# Altium PCB LLR-05U (Main-Board-PCB).PcbDoc
Units mil, origin at the board's own origin, x right, y up, seen from the top; angles counter-clockwise.
Board outline 1291.34 x 3385.83 mil, 2 copper layers (Top Layer, Bottom Layer), stack 57 mil thick; 28 components, 31 nets, 83 pads, 7 vias.
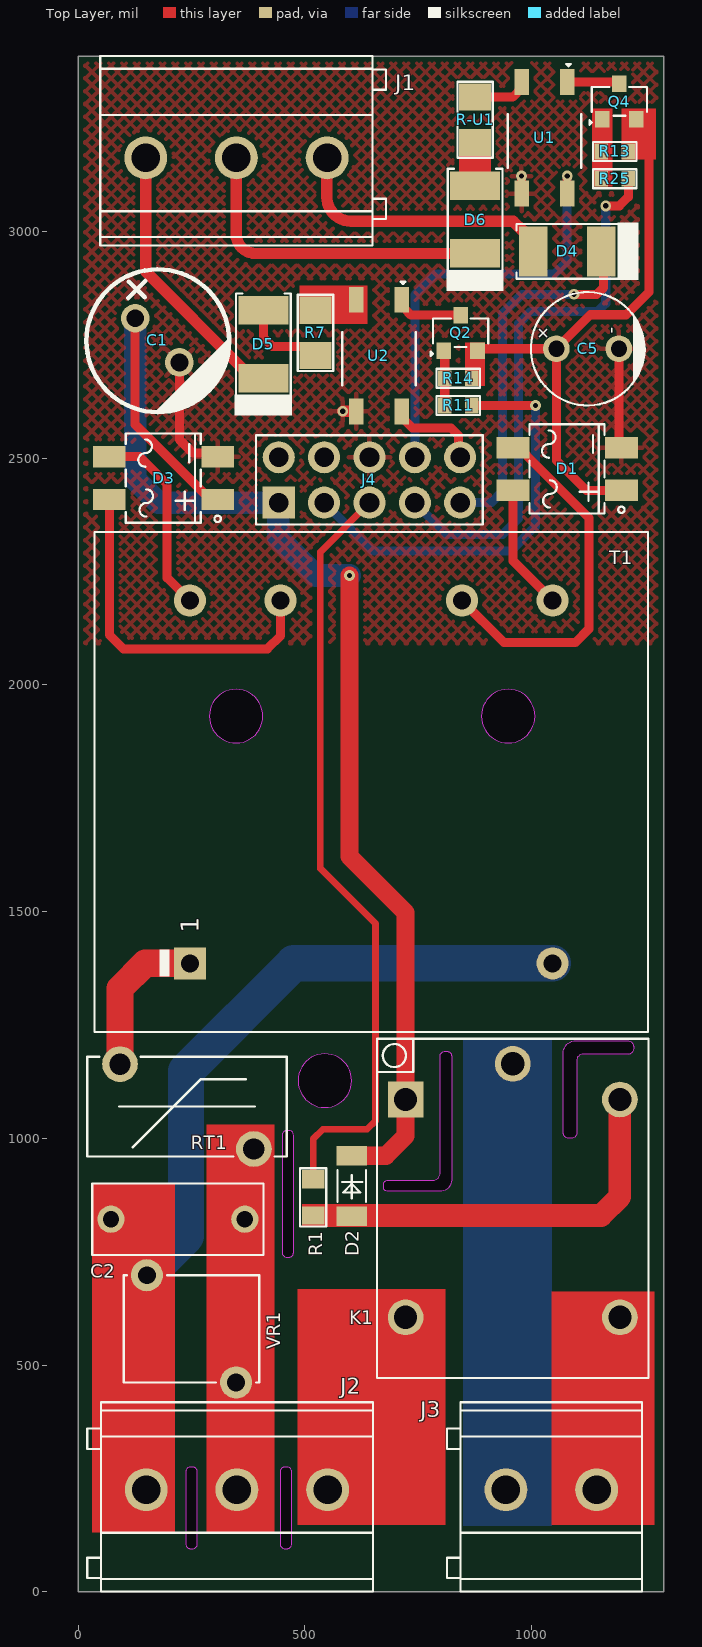
[diagram p0: Top Layer view]
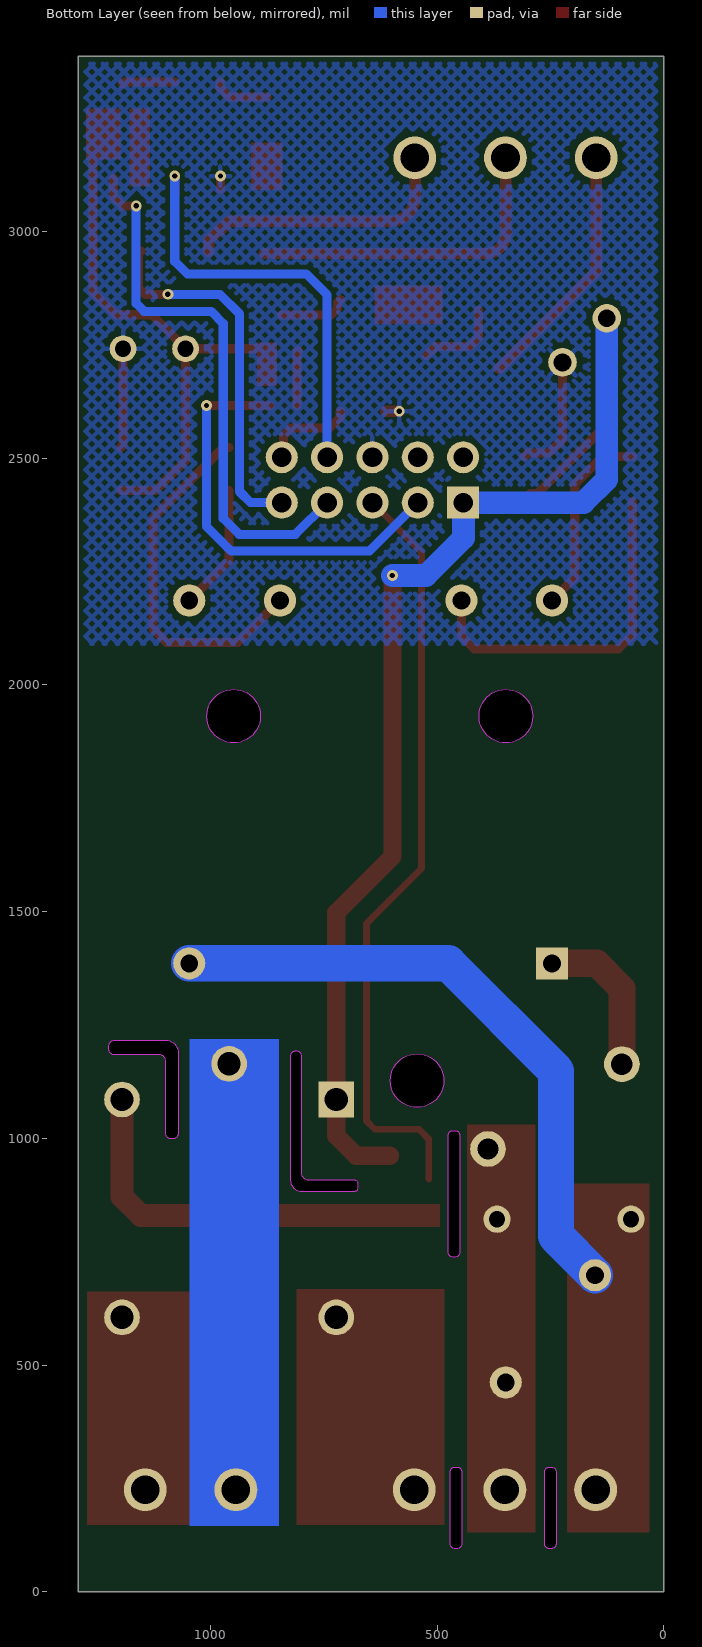
[diagram p1: Bottom Layer view, seen from below]
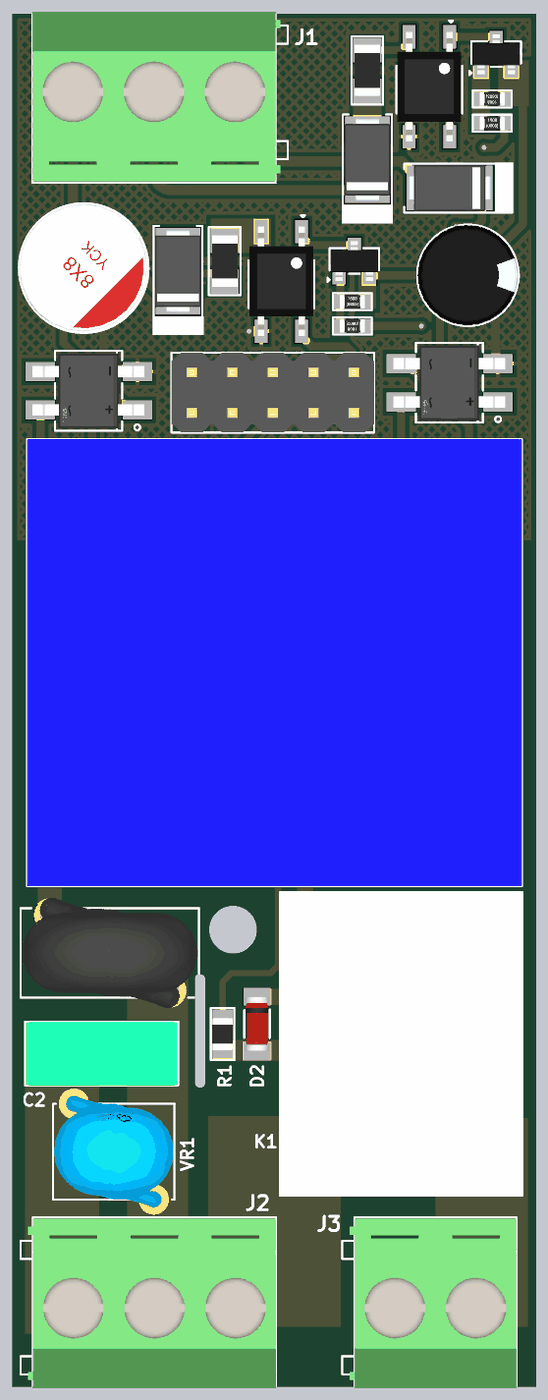
[diagram p2: 3D render of the assembled board from above, using the file's embedded part models]

## Layer stack, top to bottom
Top Solder: solder mask 3, Solder Resist, Dk 3.5
Top Layer: signal copper 10
Dielectric 1: dielectric 37, FR-4, Dk 4.8
Bottom Layer: signal copper 10
Bottom Solder: solder mask 3, Solder Resist, Dk 3.5

## Board outline
0,0 0,3385.83 1291.34,3385.83 1291.34,0
cut-out: 450,748 ccw(c460,748) 460,738 465,738 ccw(c465,748) 475,748 475,1007 ccw(c465,1007) 465,1017 460,1017 ccw(c460,1007) 450,1007
cut-out: 237.65,105.24 ccw(c247.65,105.24) 247.65,95.24 252.65,95.24 ccw(c252.65,105.24) 262.65,105.24 262.65,265.24 ccw(c252.65,265.24) 252.65,275.24 247.65,275.24 ccw(c247.65,265.24) 237.65,265.24
cut-out: 673.34,892.83 673.34,897.83 cw(c683.34,897.83) 683.34,907.83 783.34,907.83 ccw(c783.34,922.83) 798.34,922.83 798.34,1181.83 cw(c808.34,1181.83) 808.34,1191.83 813.34,1191.83 cw(c813.34,1181.83) 823.34,1181.83 823.34,907.83 cw(c798.34,907.83) 798.34,882.83 683.34,882.83 cw(c683.34,892.83)
cut-out: 289.28,1930.83 ccw(c348.34,1930.83) 348.34,1871.77 ccw(c348.34,1930.83) 407.39,1930.83 ccw(c348.34,1930.83) 348.34,1989.88 ccw(c348.34,1930.83)
cut-out: 889.28,1930.83 ccw(c948.34,1930.83) 948.34,1871.77 ccw(c948.34,1930.83) 1007.39,1930.83 ccw(c948.34,1930.83) 948.34,1989.88 ccw(c948.34,1930.83)
cut-out: 484.91,1127.14 ccw(c543.97,1127.14) 543.97,1068.09 ccw(c543.97,1127.14) 603.02,1127.14 ccw(c543.97,1127.14) 543.97,1186.2 ccw(c543.97,1127.14)
cut-out: 445.65,105.24 ccw(c455.65,105.24) 455.65,95.24 460.65,95.24 ccw(c460.65,105.24) 470.65,105.24 470.65,265.24 ccw(c460.65,265.24) 460.65,275.24 455.65,275.24 ccw(c455.65,265.24) 445.65,265.24
cut-out: 1224.63,1202.61 1224.63,1197.61 cw(c1212.12,1197.61) 1212.12,1185.1 1112.12,1185.1 ccw(c1112.12,1172.61) 1099.63,1172.61 1099.63,1012.61 cw(c1087.12,1012.61) 1087.12,1000.1 1082.12,1000.1 cw(c1082.12,1012.61) 1069.6,1012.61 1069.6,1187.61 cw(c1097.12,1187.61) 1097.12,1215.13 1212.12,1215.13 cw(c1212.12,1202.61)

## Design rules (kind name [scope] priority, off if disabled: settings)
BoardOutlineClearance [All] p1: gap=0 ignorepadtopadclearanceinfootprint=FALSE except(10: Poly-OutlineEdge)
Clearance [All] p1: gap=10 ignorepadtopadclearanceinfootprint=FALSE except(0: Arc-Hole Track-Hole SMDPad-Hole THPad-Hole Via-Hole Fill-Hole Poly-Hole Region-Hole Text-Hole)
ComponentClearance [All] p1: gap=0 collisioncheckmode=3 verticalgap=0 showdistances=FALSE
Height [All] p1: minheight=0 maxheight=5000 prefheight=500
PolygonConnect [All] p1: connectstyle=Relief reliefconductorwidth=10 reliefentries=4 polygonreliefangle="90 Angle" airgapwidth=10
RoutingVias [All] p1: holewidth=11.81 width=23.62 viastyle="Through Hole" minholewidth=11.81 minwidth=23.62 maxholewidth=11.81 maxwidth=23.62
SilkToSolderMaskClearance [IsPad] p1: minsilkscreentomaskgap=0 clearancetoexposedcopper=TRUE
SolderMaskExpansion [All] p1: expansion=4 istentingtop=FALSE
Width [All] p1: maxlimit=100 minlimit=7 preferedwidth=10 minimp=50.000000 maximp=50.000000 favimp=50.000000
27 further rules are at their usual default settings.

## Components (designator, comment, footprint, x,y, rotation, side; value= is the part's Value field where it differs from the comment)
C1 "330uF" RC035M331LO8*14TH-2A1E 174.62,2759.55 r315 top
C2 "100nF- 400V" 82CL0114 220,821.74 r0 top
C5 "47uF" Plugin,D6.3xL12mm 1123.34,2740.83 r0 top
D1 "MB10S" MBS10S 1078.34,2475.83 r180 top
D2 "LL4148" LL-34 603.34,894.83 r270 top
D3 "MB10S" MBS10S 188.34,2455.83 r180 top
D4 "M7" SMA(DO-214AC) 1078.34,2955.83 r180 top
D5 "M7" SMA(DO-214AC) 408.34,2750.83 r90 top
D6 "M7" SMA(DO-214AC) 875.34,3025.83 r90 top
J1 "KF129-5.08-3P" KF129-5.08-3P 349.04,3161.71 r180 top
J2 "KF129-5.08-3P" KF129-5.08-3P 350.22,225.24 r0 top
J3 "KF129-5.08-2P" KF129-5.08-2P 1043.34,225.3 r0 top
J4 "PH-01338" PH-01338 642.39,2451.57 r0 top
K1 "HF3FA-012-ZSTF" HF3FA-012-ZSTF 958.34,884.83 r270 top
Q2 "BC856B" SOT-23 843.34,2775.83 r0 top
Q4 "BC856B" SOT-23 1193.34,3285.83 r0 top
R1 "10R" RES-0805 518.34,869.83 r270 top
R7 "2.2K" Res-1206 523.34,2775.83 r90 top
R11 "1K" Res-0603 838.34,2615.83 r0 top
R13 "47K" Res-0603 1183.34,3175.83 r0 top
R14 "47K" Res-0603 838.34,2675.83 r180 top
R25 "1K" Res-0603 1183.34,3115.83 r180 top
R-U1 "2.2K" Res-1206 875.34,3245.83 r90 top
RT1 "10R" 10D-9 240,1070 r180 top
T1 "PE2818-I 2VA 220V 12Vx2" PE2818-I 646.34,1785.83 r90 top
U1 "TLP185(GB-TPL,SE(T" SOP-4_2.54 1028.34,3205.83 r270 top
U2 "TLP185(GB-TPL,SE(T" SOP-4_2.54 663.34,2725.83 r270 top
VR1 "VDR-05D471K" VDR-05D471K 250,580 r0 top

## Footprints (in the part's own frame and the unit in brackets; to place one, negate y for a bottom-side part, rotate by r counter-clockwise, add the part's x,y. Pads: shape width x height; smd on the part's side, far side on the other; paste and mask are expansions set on the pad)
10D-9 [mm]
  round 2 hole 1.2 paste+0 mask+0.051: 1(-3.75,2.375) 2(3.75,-2.375)
  silkscreen extent -5.59,-2.79 5.59,2.79, body extent -5.5,-3.46 5.5,3.46, height 15.1
82CL0114 [mil]
  round 60 hole 36 paste+0 mask+2: 1(-147.64,0) 2(147.64,0)
  silkscreen extent -189,-79 189,79, body extent -187,-79 187,79, height 354
HF3FA-012-ZSTF [mm]
  rect 2x2 hole 1.3 paste+0 mask+0.051: 1(-5.1,-6)
  round 2 hole 1.3 paste+0 mask+0.051: 2(7.1,-6) 3(7.1,6) 4(-5.1,6) 5(-7.1,0)
  silkscreen extent -8.5,-7.6 10.5,7.6, body extent -8.5,-7.6 10.5,7.61, height 15.5
KF129-5.08-2P [mm]
  round 2.4 hole 1.6 paste+0 mask+0.051: 1(-2.54,0) 2(2.54,0)
  silkscreen extent -5.84,-5.7 5.08,4.9, body extent -5.38,-5.8 5.08,4.8, height 18.4
KF129-5.08-3P [mm]
  round 2.4 hole 1.6 paste+0 mask+0.051: 1(-5.08,0) 2(0,0) 3(5.08,0)
  silkscreen extent -8.38,-5.7 7.62,4.9, body extent -7.92,-5.8 7.62,4.8, height 18.4
LL-34 [mm]
  rect 1.1x1.7 smd paste+0 mask+0.051: 1(-1.7,0) 2(1.7,0)
  silkscreen extent -0.9,-0.8 0.9,0.8, body extent -1.7,-0.74 1.7,0.74, height 1.5
MBS10S [mm]
  rect 1.84x1.2 smd paste+0 mask+0.051: 1(-3.037,1.2) 2(-3.036,-1.2) 3(3.037,-1.2) 4(3.036,1.2)
  silkscreen extent -3.21,-2.5 2.11,2.5, body extent -3.47,-2.35 3.53,2.35, height 2.62
PE2818-I [mm]
  rect 1.8x1.8 hole 1: 1(-10.16,10.16)
  round 1.8 hole 1: 5(-10.16,-10.16) 6(10.16,-10.16) 7(10.16,-5.08) 9(10.16,5.08) 10(10.16,10.16)
  silkscreen extent -14,-15.5 14,15.5, body extent -14,-15.5 14,15.5, height 31.5
PH-01338 [mm]
  rect 1.8x1.8 hole 1.1 paste+0 mask+0.051: 1(-5.08,-1.27)
  round 1.8 hole 1.1 paste+0 mask+0.051: 2(-5.08,1.27) 3(-2.54,-1.27) 4(-2.54,1.27) 5(0,-1.27) 6(0,1.27) 7(2.54,-1.27) 8(2.54,1.27) 9(5.08,-1.27) 10(5.08,1.27)
  silkscreen extent -6.35,-2.5 6.35,2.5, body extent -6.35,-2.5 6.36,2.5, height 15
Plugin,D6.3xL12mm [mm]
  round 1.5 hole 0.9 paste+0 mask+0.05: 1(-1.75,0) 2(1.75,0)
  silkscreen extent -3.17,-3.17 3.26,3.17, body extent -3.15,-3.15 3.15,3.15, height 12.1
RC035M331LO8*14TH-2A1E [mm]
  round 1.6 hole 1 paste+0 mask+0.051: 1(-1.75,0) 2(1.75,0)
  silkscreen extent -3.96,-4 4.04,4, body extent -4,-4.01 4,4, height 8
Res-0603 [mil]
  rect 30x35 smd: 1(-30,0) 2(30,0)
  silkscreen extent -48,-21 48,21, body extent -31,-17 31,17, height 18
RES-0805 [mil] "SMD 0805"
  rect 40x50 smd: 1(-40,0) 2(40,0)
  silkscreen extent -64,-29 64,29, body extent -39,-25 39,24, height 24
Res-1206 [mil]
  rect 60x70 smd: 1(-50,0) 2(50,0)
  silkscreen extent -84,-39 84,39, body extent -63,-31 63,31, height 24
SMA(DO-214AC) [mm]
  rect 1.6x2.8 smd: 1(-1.9,0) 2(1.9,0)
  silkscreen extent -3.99,-1.6 2.84,1.6, body extent -2.6,-1.45 2.6,1.45, height 2.3
SOP-4_2.54 [mm]
  rect 1.45x0.8 smd: 1(-3.125,1.27) 2(-3.125,-1.27) 3(3.125,-1.27) 4(3.125,1.27)
  silkscreen extent -4.14,-2.06 1.68,2.06, body extent -3.43,-2 3.43,2, height 2.02
SOT-23 [mm] "TRANS NPN 40V 0.6A SOT23"
  rect 0.82x0.92 smd: 1(-0.95,-1) 2(0.95,-1) 3(0,1)
  silkscreen extent -1.68,-1.3 1.55,0.81, body extent -1.5,-1.25 1.5,1.25, height 1.05
VDR-05D471K [mm]
  round 1.8 hole 1 paste+0 mask+0.051: 1(-2.5,3) 2(2.5,-3)
  silkscreen extent -3.8,-3 3.81,3, body extent -3.74,-3.5 3.74,3.5, height 9.09

## Part data
C1: library part RC035M331LO8*14TH-2A1E, "330uF 35V ±20% 860mA@100kHz Plugin,D8xL14mm Aluminum Electrolytic Capacitors - Leaded ROHS", LCSC Part Number=C357626, Manufacturer="BERYL Electronic Tech", Package=Plugin,D8xL14mm, ComponentLink1Description=LCSC, ComponentLink1URL=https://www.lcsc.com/product-detail/Aluminum-Electrolytic-Capacitors-Leaded_BERYL-Electronic-Tech-RC035M331LO8-14TH-2A1E_C357626.html, Item Type=Capacitor, Manufacturer Part Number=RC035M331LO8*14TH-2A1E
C2: library part 82CL0114, "5% 400V 100nF PET Plugin,P=7.5mm Film Capacitors ROHS", LCSC Part Number=C5359295, Manufacturer=KNSCHA, Package=Plugin,P=7.5mm, ComponentLink1Description=LCSC, ComponentLink1URL=https://www.lcsc.com/product-detail/Film-Capacitors_KNSCHA-82CL0114_C5359295.html, Manufacturer Part Number=82CL0114
C5: library part 03EC0571, "47uF 50V ±20% 180mA@100kHz Plugin,D6.3xL12mm Aluminum Electrolytic Capacitors - Leaded ROHS", LCSC Part Number=C2831773, Manufacturer=KNSCHA, Package=Plugin,D6.3xL12mm, ComponentLink1Description=LCSC, ComponentLink1URL=https://www.lcsc.com/product-detail/Aluminum-Electrolytic-Capacitors-Leaded_KNSCHA-03EC0571_C2831773.html, Item Type=Capacitor, Manufacturer Part Number=03EC0571
D1 D3: "35A 1.1V@400mA 1A 1kV MBS Bridge Rectifiers ROHS", JLCPCB Part Number=C2488, Manufacturer=MDD, Package=MBS, ComponentLink1Description=LCSC, ComponentLink1URL=https://www.lcsc.com/product-detail/Bridge-Rectifiers_MCC_MB6S-TP_MB6S-TP_C85619.html?gclid=CjwKCAjwjOunBhB4EiwA94JWsPhP5VxdRhkKtNAXxaeRo8Kbw1z5VNRY74bvbkYd4a4LtLXYHGrsEhoCPX4QAvD_BwE, Item Type="Bridge Rectifier", Manufacturer Part Number=MB10S
D2: "75V 1V@10mA 4ns 200mA LL-34 Switching Diode ROHS", LCSC Part Number=C435829, Manufacturer=MDD, Package=LL-34, ComponentLink1Description=LCSC, ComponentLink1URL=https://www.lcsc.com/product-detail/Switching-Diode_MDD-Microdiode-Electronics-LL4148_C435829.html, Item Type=Diode, Manufacturer Part Number=LL4148
D4 D5 D6: "1A 1.1V@1A 1kV DO-214AC Diodes - General Purpose ROHS", LCSC Part Number=C2902910, Manufacturer=MSKSEMI, Package=DO-214AC, ComponentLink1Description=LCSC, ComponentLink1URL=https://www.lcsc.com/product-detail/Diodes-General-Purpose_MSKSEMI-M7_C2902910.html, Item Type=Diode, Manufacturer Part Number=M7
J1 J2: "1x3P 24A -40℃~+105℃ 250V Green 12~24 Straight 5.08mm 2.5 1 3 Plugin,P=5.08mm Screw terminal ROHS", LCSC Part Number=C475093, Manufacturer="CiXi KaiFeng Electronics", Item Type="Screw Terminal", Manufacturer Part Number=KF129-5.08-3P, RoHS=No, Supplier=LCSC
J3: "1x2P 24A -40℃~+105℃ 250V Green 12~24 Straight 5.08mm 2.5 1 2 Plugin,P=5.08mm Screw terminal ROHS", LCSC Part Number=C475092, Manufacturer="CiXi KaiFeng Electronics", Item Type="Screw terminal", Manufacturer Part Number=KF129-5.08-2P, RoHS=No, Supplier=LCSC
J4: "3A Straight Square Pins 10P 3mm -40℃~+105℃ 3mm 2.54mm 双排 Black 2x5P 2.54mm Plugin,P=2.54mm Pin Headers ROHS", LCSC Part Number=C2685218, Manufacturer=Liansheng, Package=Plugin,P=2.54mm, ComponentLink1Description=LCSC, ComponentLink1URL=https://www.lcsc.com/product-detail/Pin-Headers_Liansheng-PH-01338_C2685218.html, Item Type="Pin Header", Manufacturer Part Number=PH-01338
K1: "12V SPDT (1 Form C) Plugin,15.2x19mm Power Relays ROHS", LCSC Part Number=C190455, Manufacturer=HF(宏发), Item Type=Relay, Manufacturer Part=HF3FA-012-ZSTF, Supplier=LCSC
Q2 Q4: "65V 200mW 220@2mA,5V 100mA PNP SOT-23 Bipolar Transistors - BJT ROHS", LCSC Part Number=C181144, Manufacturer="Guangdong Hottech", Package=SOT-23, ComponentLink1Description=LCSC, ComponentLink1URL=https://www.lcsc.com/product-detail/Bipolar-Transistors-BJT_Guangdong-Hottech-BC856B_C181144.html, Item Type=Transistors, Manufacturer Part Number=BC856B
R1: library part 0805W8F100JT5E, "125mW Thick Film Resistors 150V ±1% ±200ppm/℃ 10Ω 0805 Chip Resistor - Surface Mount ROHS", LCSC Part Number=C17415, Manufacturer="Royal Electronic Factory", Item Type=Resistor, Manufacturer Part Number=0805W8F100JT5E, Pricing="10000=0.002 (USD)", RoHS=No, Stock=270000, Supplier=Mouser
R7 R-U1: library part 1206W4F2201T5E, "250mW Thick Film Resistors 200V ±100ppm/℃ ±1% 2.2kΩ 1206 Chip Resistor - Surface Mount ROHS", LCSC Part Number=C17948, Manufacturer=Uniroyal, Category=LDO, Item Type=Resistor, Manufacturer Part Number=1206W4F2201T5E, RoHS=Yes, RoHS Compliant=Yes, Supplier=LCSC
R11 R25: library part RT0603BRD071KL, "RES SMD 1K OHM 0.1% 1/10W 0603", Case Code (Imperial)=0603, Case Code (Metric)=1608, LCSC Part Number=C110776, Manufacturer=Yageo, Max Operating Temperature=125°C, Max Power Dissipation=100mW, Min Operating Temperature=-55°C, Package Quantity=5000, Resistance=1kR, Resistor Type="Thin Film", Temperature Coefficient=25ppm/°C, Voltage Rating=75V, Voltage Rating (DC)=50V, Case/Package=0603, Category="Chip SMD Resistors", ComponentLink1Description=https://datasheet.ciiva.com/11819/0900766b8079c86e-11819652.pdf?src-supplier=RSComponents, ComponentLink1URL=https://datasheet.ciiva.com/11819/0900766b8079c86e-11819652.pdf?src-supplier=RSComponents, ComponentLink2Description=https://datasheet.ciiva.com/5624/pyu-rt-1-to-0-05-rohs-l-4-5624759.pdf?src-supplier=Mouser, ComponentLink2URL=https://datasheet.ciiva.com/5624/pyu-rt-1-to-0-05-rohs-l-4-5624759.pdf?src-supplier=Mouser, ComponentLink3Description=https://datasheet.ciiva.com/29718/pyu-rt-1-to-0-05-rohs-l-4-29718010.pdf?src-supplier=Digi-Key, ComponentLink3URL=https://datasheet.ciiva.com/29718/pyu-rt-1-to-0-05-rohs-l-4-29718010.pdf?src-supplier=Digi-Key, ComponentLink4Description=https://datasheet.ciiva.com/29718/pyu-rt-1-to-0-05-rohs-l-4-29718011.pdf?src-supplier=Digi-Key, ComponentLink4URL=https://datasheet.ciiva.com/29718/pyu-rt-1-to-0-05-rohs-l-4-29718011.pdf?src-supplier=Digi-Key, Construction=Rectangular, Contact Plating=Tin,Lead, Depth=0.8mm, Features="Moisture Resistant", Height=0.022inch, Item Type=Resistor, Lead Free="Lead Free", Length=1.6mm, Manufacturer Part Number=RT0603BRD071KL, Military Standard=Not, Mount="Surface Mount", Number of Terminations=2, Packaging="Tape and Reel", Power Rating=100mW, Pricing 1="5000=0.03900, 10000=0.03450, 25000=0.03070, 50000=0.02040 (USD)", RoHS=Yes, RoHS Compliant=Yes, Series=RT, Size Code=0603, Stock 1=130000, Supplier 1="Arrow Electronics", Supplier Part Number 1=RT0603BRD071KL, Technology="THIN FILM", Termination=SMD/SMT, Width=0.031inch
R13 R14: library part RT0603BRD0747KL, "RES SMD 47K OHM 0.1% 1/10W 0603", Case Code (Imperial)=0603, Case Code (Metric)=1608, LCSC Part Number=C326725, Manufacturer=Yageo, Max Operating Temperature=125°C, Max Power Dissipation=100mW, Min Operating Temperature=-55°C, Package Quantity=5000, Resistance=47kR, Resistor Type="Thin Film", Temperature Coefficient=25ppm/°C, Voltage Rating=75V, Voltage Rating (DC)=50V, Case/Package=0603, Category="Chip SMD Resistors", ComponentLink1Description=https://datasheet.ciiva.com/2585/pyu-rt-1-to-0-05-rohs-l-4-2585964.pdf?src-supplier=Digi-Key, ComponentLink1URL=https://datasheet.ciiva.com/2585/pyu-rt-1-to-0-05-rohs-l-4-2585964.pdf?src-supplier=Digi-Key, ComponentLink2Description=https://datasheet.ciiva.com/46635/pyu-rt-1-to-0-05-rohs-l-5-46635309.pdf?src-supplier=Digi-Key, ComponentLink2URL=https://datasheet.ciiva.com/46635/pyu-rt-1-to-0-05-rohs-l-5-46635309.pdf?src-supplier=Digi-Key, Construction=Rectangular, Contact Plating=Tin,Lead, Depth=0.8mm, Features="Moisture Resistant", Height=0.022inch, Item Type=Resistor, Lead Free="Lead Free", Length=0.063inch, Manufacturer Part Number=RT0603BRD0747KL, Military Standard=Not, Number of Terminations=2, Packaging="Tape and Reel", Power Rating=100mW, Pricing 1="1=0.29190, 10=0.22910, 25=0.22680, 100=0.09530, 250=0.09440, 500=0.09340, 1000=0.04780, 3000=0.03070 (USD)", RoHS=Yes, RoHS Compliant=Yes, Series=RT, Stock 1=5153, Supplier 1="Arrow Electronics", Supplier Part Number 1=RT0603BRD0747KL, Termination=SMD/SMT, Width=0.031inch
RT1: library part 10D-9, "10Ω 2A 2700K Plugin,P=7.5mm NTC Thermistors ROHS", LCSC Part Number=C2839611, Manufacturer=SURGING, Package=Plugin,P=7.5mm, ComponentLink1Description=LCSC, ComponentLink1URL=https://www.lcsc.com/product-detail/NTC-Thermistors_SURGING-10D-9_C2839611.html, Item Type="NTC Thermistor", Manufacturer Part Number=10D-9
T1: "Power 2VA 220V / 6Vx2/7.5Vx2/9Vx2/12Vx2/15Vx2/18Vx2/24Vx2 Encapsulated For PCB Mounted Isolation Transformer", Manufacturer=YHDC, Manufacturer Part Number=PE2818-I, ComponentLink1Description=LCSC, ComponentLink1URL=https://vi.aliexpress.com/item/32737778653.html?gatewayAdapt=4itemAdapt, Item Type=Transformer
U1 U2: "80V 3.75kV 50mA 300mV@2.4mA,8mA 1 5V 1.25V DC SOP-4-2.54mm Transistor Output Optocoupler ROHS", LCSC Part Number=C7240, Manufacturer=TOSHIBA, Package=SOP-4-2.54mm, ComponentLink1Description=LCSC, ComponentLink1URL=https://www.lcsc.com/product-detail/Transistor-Output-Optocoupler_TOSHIBA-TLP185-GB-TPL-SE-T_C7240.html, Item Type=Optocoupler, Manufacturer Part Number=TLP185(GB-TPL,SE(T
VR1: "810V 385V 300V 423V~517V Plugin Varistors ROHS", LCSC Part Number=C273543, Manufacturer="VDR Varistor", Package=Plugin, ComponentLink1Description=LCSC, ComponentLink1URL=https://www.lcsc.com/product-detail/Varistors_VDR-span-style-background-color-ff0-Varistor-span-VDR-05D471K_C273543.html, Item Type=Varistors, Manufacturer Part Number=VDR-05D471K

## Via types
v1: diameter 23.62, hole 11.81, Top Layer to Bottom Layer, tented both sides, 7 vias

## Nets (pads, with @x,y where several pads share a name; then routed paths per layer and width w, separated by ;. In a path a pad name is that pad's centre, name@x,y a point inside that pad or via, vN(x,y) a via of type N, cw(c..) or ccw(c..) an arc to the next point about the centre after c; other vN are vias at no path point)
#AC1: C2.2 J2.2 RT1.1 VR1.2
+12V-1: C1.1 D2.1 D3.1 J4.1 K1.1 | length 2871.3
  Top Layer w20: C1.1 125.9,2573.89 277.58,2422.21 294.27,2422.21 D3.1
  Top Layer w40: v1(598.34,2240.83) 598.34,1621.44 722.12,1497.66 K1.1 722.12,1005.37 678.51,961.76 D2.1
  Bottom Layer w50: C1.1 125.9,2452.48 176.8,2401.57 J4.1 441.43,2400.61 441.43,2323.68 524.28,2240.83 v1(598.34,2240.83)
+12V-2: C5.1 D1.1 Q2.2 Q4.2 R13.2 R14.1 | length 1270.5
  Top Layer w20: R14.1 868.34,2678.33 873.34,2683.33 875.08,2683.33 886.79,2695.04 886.79,2730.41 Q2.2 885.11,2740.83 C5.1 ; D1.1 1120.58,2428.58 1054.44,2494.72 C5.1 ; R13.2 1250.84,3175.83 1258.34,3168.33 1258.34,2865.83 1208.34,2815.83 1129.44,2815.83 C5.1
AC1: RT1.2 T1.1 | length 343.8
  Top Layer w60: RT1.2 92.36,1330.36 147.83,1385.83 T1.1
AC2: C2.1 J2.1 T1.5 VR1.1 | length 1392.8
  Bottom Layer w80: VR1.1 237.91,784.45 237.91,1148.32 475.42,1385.83 T1.5
GND: C1.2 C5.2 D1.2 D3.2 J4.6 U1.3 U2.3 | length 551.7
  Top Layer w20: C1.2 223.34,2540.88 253.38,2510.84 300.11,2510.84 D3.2 ; U2.3 U2.3@614.34,2601.79 ; U1.3@977.48,3091.68 v1(977.48,3121.68) ; C5.2 1192.24,2528.71 D1.2
  Top Layer w25: v1(583.34,2602.8) U2.3
J4-3: J4.3 R11.2 | length 939.2
  Top Layer w20: R11.2 v1(1008.34,2615.83)
  Bottom Layer w20: J4.3 649.33,2294.64 953.4,2294.64 1008.34,2349.58 v1(1008.34,2615.83)
J4-7: J4.7 R25.1 | length 1223.4
  Top Layer w20: v1(1163.34,3055.83) 1193.34,3055.83 1213.34,3075.83 R25.1
  Bottom Layer w20: J4.7 812.45,2331.52 935.98,2331.52 971.32,2366.86 971.32,2796.49 998.22,2823.39 1145.9,2823.39 1163.34,2840.83 v1@1163.34,3053.3
J4-8: J4.8 U1.4 | length 953.6
  Top Layer w20: U1.4@1078.34,3080.83 v1(1078.34,3121.68)
  Bottom Layer w20: J4.8 742.39,2859.73 788.49,2905.83 1050.43,2905.83 1078.34,2933.74 v1(1078.34,3121.68)
J4-9: D4.1 J4.9 | length 823.9
  Top Layer w20: v1(1093.34,2860.83) 1143.34,2860.83 1158.34,2875.83 1158.34,2950.63 D4.1
  Bottom Layer w20: J4.9 911.02,2401.57 935.55,2426.11 935.55,2817.71 978.67,2860.83 v1(1093.34,2860.83)
J4-10: J4.10 U2.4 | length 204.5
  Top Layer w20: U2.4 713.34,2590 737.51,2565.83 822.51,2565.83 838.31,2550.03 838.31,2505.66 J4.10
"Lower Electrode": D6.1 J1.2 | length 708.9
  Top Layer w25: J1.2 348.34,3161.01 348.34,2993.8 ccw(c391.12,2993.8) 391.12,2951.02 D6.1@858.34,2951.02 ; D6.1 D6.1@881.6,2951.02
NetD1_3: D1.3 T1.7 | length 807.4
  Top Layer w20: T1.7 939.17,2092.99 1096.07,2092.99 1126.11,2123.03 1126.11,2368.06 990.01,2504.16 990.01,2504.44 971.39,2523.06 D1.3
NetD1_4: D1.4 T1.6 | length 279
  Top Layer w20: D1.4 958.8,2273.37 T1.6
NetD2_2: D2.2 K1.4 R1.2 | length 832
  Top Layer w50: D2.2@594.11,829.83 637.98,829.83 638.08,829.73 1152.94,829.73 1194.56,871.35 K1.4
NetD3_3: D3.3 T1.10 | length 429.9
  Top Layer w20: D3.3@68.79,2503.06 135.58,2503.06 196.34,2442.3 196.34,2235.83 T1.10
NetD3_4: D3.4 T1.9 | length 773.4
  Top Layer w20: D3.4@68.8,2403.58 68.8,2110.37 100,2079.17 417.45,2079.17 446.36,2108.08 T1.9
NetD4_2: D4.2 J1.1 | length 613.8
  Top Layer w25: J1.1 548.34,3161.71 548.34,3075.83 ccw(c602.22,3075.83) 602.22,3021.94 959.21,3021.94 980.21,3000.94 982.04,3000.94 1003.54,2979.45 D4.2
NetD5_2: D5.2 R7.1 | length 191.4
  Top Layer w20: D5.2 408.34,2765.83 428.34,2745.83 503.34,2745.83 R7.1
NetD6_2: D6.2 R-U1.1
NetJ2_3: J2.3 K1.2
NetJ3_1: J3.1 K1.5
NetJ3_2: J3.2 K1.3
NetJ4_5: J4.5 R1.1 | length 1701.2
  Top Layer w15: R1.1 518.34,998.87 539.47,1020 637.33,1020 655.6,1038.27 655.6,1473.54 533.93,1595.2 533.93,2293.11 J4.5
NetQ2_1: Q2.1 R11.1 R14.2 | length 121.6
  Top Layer w20: Q2.1 808.34,2734.06 R14.2 R11.1
NetQ2_3: Q2.3 U2.1 | length 151.6
  Top Layer w20: U2.1 719.09,2843.11 719.09,2830.06 733.94,2815.2 Q2.3
NetQ4_1: Q4.1 R13.1 R25.2
NetQ4_3: Q4.3 U1.1 | length 116.5
  Top Layer w20: U1.1 1189.68,3328.86 Q4.3
NetR7_2: R7.2 U2.2
NetR-U1_2: R-U1.2 U1.2 | length 124.2
  Top Layer w20: R-U1.2 958.1,3295.83 978.34,3316.06 U1.2
"Upper Electrode": D5.1 J1.3 | length 552.7
  Top Layer w25: J1.3 149.04,2911.28 D5.1@362.8,2697.52
pads on no net: J4.2 J4.4

## Polygon pours and split planes (outlines as drawn)
GND on Bottom Layer "GND_L02_P000" (hatched 45Degree grid 20 track 10, pour order 0): 1291.34,3385.83 1291.34,2090.83 0,2090.83 0,3385.83
GND on Top Layer "GND_L01_P001" (hatched 45Degree grid 20 track 8, pour order 1): 1291.34,3385.83 1291.34,2103.83 1278.34,2090.83 0,2090.83 0,3385.83

## Other copper
Top Layer:
  rectangle net #AC1: 283,130.47 433.54,1030
  rectangle net AC2: 31.02,130.47 213.25,900.48
  rectangle net NetJ2_3: 483.34,147.83 810.34,667.83
  rectangle net NetJ3_2: 1043.34,147.83 1271.34,662.83
  rectangle net +12V-2: 853.34,2658.33 896.88,2754.57
  rectangle net NetD2_2: 493.34,804.83 648.34,854.83
  rectangle net +12V-2: 1198.34,3158.33 1274.34,3270.83
  rectangle net NetQ4_1: 1133.34,3098.33 1178.34,3270.83
  rectangle net NetR7_2: 488.34,2795.83 638.34,2880.83
  rectangle net NetD6_2: 840.34,3090.83 910.34,3195.83
Bottom Layer:
  rectangle net NetJ3_1: 848.34,144.83 1045.34,1219.47

## Silkscreen, mask and mechanical layers (free items; w line width, h text height)
Dimensions:
  drawing of 191 lines, arcs and shapes, not listed
  text "Layer" at -1774.92,6598.83 h60
  text "Name" at -1365.01,6598.83 h60
  text "Material" at -435.26,6598.83 h60
  text "Thickness" at 424.5,6598.83 h60
  text "Constant" at 1074.34,6598.83 h60
  text "Board Layer Stack" at 1644.2,6598.83 h60
  text "Top Overlay" at -1365.01,6478.83 h60
  text "Top Solder" at -1365.01,6358.83 h60
  text "Solder Resist" at -435.26,6358.83 h60
  text "0.076mm" at 424.5,6358.83 h60
  text "3.5" at 1074.34,6358.83 h60
  text "1" at -1774.92,6238.83 h60
  text "Top Layer" at -1365.01,6238.83 h60
  text "0.254mm" at 424.5,6238.83 h60
  text "Dielectric 1" at -1365.01,6118.83 h60
  text "FR-4" at -435.26,6118.83 h60
  text "0.940mm" at 424.5,6118.83 h60
  text "4.8" at 1074.34,6118.83 h60
  text "2" at -1774.92,5998.83 h60
  text "Bottom Layer" at -1365.01,5998.83 h60
  text "0.254mm" at 424.5,5998.83 h60
  text "Bottom Solder" at -1365.01,5878.83 h60
  text "Solder Resist" at -435.26,5878.83 h60
  text "0.076mm" at 424.5,5878.83 h60
  text "3.5" at 1074.34,5878.83 h60
  text "Bottom Overlay" at -1365.01,5758.83 h60
  text "Total board thickness:" at -1774.92,5638.83 h60
  text "1.600mm" at 424.5,5638.83 h60
Board Outline:
  circle w10: c348.34,1930.83 r59.06
  circle w10: c948.34,1930.83 r59.06
  circle w10: c543.97,1127.14 r59.06
  lines w5: 1202.12,1212.61 1212.12,1212.61 ; 1212.12,1212.61 cw(c1212.12,1202.61) 1222.12,1202.61 1222.12,1197.61 cw(c1212.12,1197.61) 1212.12,1187.61 1112.12,1187.61 ccw(c1112.12,1172.61) 1097.12,1172.61 1097.12,1012.61 cw(c1087.12,1012.61) 1087.12,1002.61 1082.12,1002.61 cw(c1082.12,1012.61) 1072.12,1012.61 1072.12,1177.61 1072.12,1187.61 cw(c1097.12,1187.61) 1097.12,1212.61 1212.12,1212.61 ; 237.65,105.24 ccw(c247.65,105.24) 247.65,95.24 252.65,95.24 ccw(c252.65,105.24) 262.65,105.24 262.65,265.24 ccw(c252.65,265.24) 252.65,275.24 247.65,275.24 ccw(c247.65,265.24) 237.65,265.24 237.65,105.24 ; 445.65,105.24 ccw(c455.65,105.24) 455.65,95.24 460.65,95.24 ccw(c460.65,105.24) 470.65,105.24 470.65,265.24 ccw(c460.65,265.24) 460.65,275.24 455.65,275.24 ccw(c455.65,265.24) 445.65,265.24 445.65,105.24 ; 450,748 ccw(c460,748) 460,738 465,738 ccw(c465,748) 475,748 475,1007 ccw(c465,1007) 465,1017 460,1017 ccw(c460,1007) 450,1007 450,748 ; 673.34,892.83 ccw(c683.34,892.83) 683.34,882.83 798.34,882.83 ccw(c798.34,907.83) 823.34,907.83 823.34,1181.83 ccw(c813.34,1181.83) 813.34,1191.83 808.34,1191.83 ccw(c808.34,1181.83) 798.34,1181.83 798.34,922.83 cw(c783.34,922.83) 783.34,907.83 683.34,907.83 ccw(c683.34,897.83) 673.34,897.83 673.34,892.83
  lines w10: 0,0 1291.34,0 1291.34,3385.83 0,3385.83 0,0
Drill Drawing:
  circle w10: c-1735.04,4473.66 r33.33
  lines w10: -1768.37,4590.33 -1701.7,4590.33 -1701.7,4656.99 -1768.37,4656.99 -1768.37,4590.33 ; -1768.37,4740.33 -1735.04,4756.99 -1701.7,4740.33 -1718.37,4773.66 -1701.7,4806.99 -1735.04,4790.33 -1768.37,4806.99 -1751.7,4773.66 -1768.37,4740.33 ; -1768.37,4890.33 -1768.37,4906.99 -1751.7,4923.66 -1768.37,4940.33 -1768.37,4956.99 -1751.7,4956.99 -1735.04,4940.33 -1718.37,4956.99 -1701.7,4956.99 -1701.7,4940.33 -1718.37,4923.66 -1701.7,4906.99 -1701.7,4890.33 -1718.37,4890.33 -1735.04,4906.99 -1751.7,4890.33 -1768.37,4890.33 ; -1768.37,5056.99 -1751.7,5056.99 -1735.04,5040.33 -1718.37,5056.99 -1701.7,5056.99 -1718.37,5073.66 -1701.7,5090.33 -1718.37,5090.33 -1735.04,5106.99 -1751.7,5090.33 -1768.37,5090.33 -1751.7,5073.66 -1768.37,5056.99 ; -1768.37,5256.99 -1701.7,5256.99 -1735.04,5190.33 -1768.37,5256.99
  lines w15: -1828.16,4395.33 9342.71,4395.33 ; -1828.16,5295.33 9342.71,5295.33 ; -1277.29,4245.33 -1277.29,5445.33 ; -737.42,4245.33 -737.42,5445.33 ; 362.25,4245.33 362.25,5445.33 ; 868.13,4245.33 868.13,5445.33 ; 1601.93,4245.33 1601.93,5445.33 ; 3101.48,4245.33 3101.48,5445.33 ; 3691.33,4245.33 3691.33,5445.33 ; 4437.13,4245.33 4437.13,5445.33 ; 5776.73,4245.33 5776.73,5445.33 ; 6630.5,4245.33 6630.5,5445.33 ; 7964.1,4245.33 7964.1,5445.33 ; -1828.16,4245.33 9342.71,4245.33 9342.71,5445.33 -1828.16,5445.33 -1828.16,4245.33
  text "Symbol" at -1738.16,5340.33 h72
  text "Count" at -1232.29,5340.33 h72
  text "Hole Size" at -692.42,5340.33 h72
  text "Plated" at 407.25,5340.33 h72
  text "Hole Type" at 913.13,5340.33 h72
  text "Drill Layer Pair" at 1646.93,5340.33 h72
  text "Via/Pad" at 3146.48,5340.33 h72
  text "Pad Shape" at 3736.33,5340.33 h72
  text "Template" at 4482.13,5340.33 h72
  text "Description" at 5821.73,5340.33 h72
  text "Hole Tolerance (+)" at 6675.5,5340.33 h72
  text "Hole Tolerance (-)" at 8009.1,5340.33 h72
  text "2" at -1232.29,5190.33 h60
  text "35.43mil (0.900mm)" at -692.42,5190.33 h60
  text "PTH" at 407.25,5190.33 h60
  text "Round" at 913.13,5190.33 h60
  text "Top Layer - Bottom Layer" at 1646.93,5190.33 h60
  text "Pad" at 3146.48,5190.33 h60
  text "Rounded" at 3736.33,5190.33 h60
  text "c150h90m155mx155p150" at 4482.13,5190.33 h60
  text "5" at -1232.29,5040.33 h60
  text "51.18mil (1.300mm)" at -692.42,5040.33 h60
  text "PTH" at 407.25,5040.33 h60
  text "Round" at 913.13,5040.33 h60
  text "Top Layer - Bottom Layer" at 1646.93,5040.33 h60
  text "Pad" at 3146.48,5040.33 h60
  text "(Mixed)" at 3736.33,5040.33 h60
  text "(Mixed)" at 4482.13,5040.33 h60
  text "7" at -1232.29,4890.33 h60
  text "11.81mil (0.300mm)" at -692.42,4890.33 h60
  text "PTH" at 407.25,4890.33 h60
  text "Round" at 913.13,4890.33 h60
  text "Top Layer - Bottom Layer" at 1646.93,4890.33 h60
  text "Via" at 3146.48,4890.33 h60
  text "Rounded" at 3736.33,4890.33 h60
  text "v60h30m0mx0" at 4482.13,4890.33 h60
  text "8" at -1232.29,4740.33 h60
  text "39.37mil (1.000mm)" at -692.42,4740.33 h60
  text "PTH" at 407.25,4740.33 h60
  text "Round" at 913.13,4740.33 h60
  text "Top Layer - Bottom Layer" at 1646.93,4740.33 h60
  text "Pad" at 3146.48,4740.33 h60
  text "(Mixed)" at 3736.33,4740.33 h60
  text "(Mixed)" at 4482.13,4740.33 h60
  text "8" at -1232.29,4590.33 h60
  text "62.99mil (1.600mm)" at -692.42,4590.33 h60
  text "PTH" at 407.25,4590.33 h60
  text "Round" at 913.13,4590.33 h60
  text "Top Layer - Bottom Layer" at 1646.93,4590.33 h60
  text "Pad" at 3146.48,4590.33 h60
  text "Rounded" at 3736.33,4590.33 h60
  text "c240h160m245mx245p240" at 4482.13,4590.33 h60
  text "10" at -1232.29,4440.33 h60
  text "43.31mil (1.100mm)" at -692.42,4440.33 h60
  text "PTH" at 407.25,4440.33 h60
  text "Round" at 913.13,4440.33 h60
  text "Top Layer - Bottom Layer" at 1646.93,4440.33 h60
  text "Pad" at 3146.48,4440.33 h60
  text "(Mixed)" at 3736.33,4440.33 h60
  text "(Mixed)" at 4482.13,4440.33 h60
  text "40 Total" at -1232.29,4290.33 h60

## Dimensions
0,3385.83 to 1291.34,3385.83 on Dimensions
1291.34,3385.83 to 1291.34,0 on Dimensions

## Text inside footprints (layer, text, board x,y; h text height)
C5: Top Overlay "-" at 1188.76,2773.82 h30 r90; Top Overlay "+" at 1028.95,2796.47 h30 r225
T1: Top Overlay "1" at 265.46,1453.7 h39.37 r90